# Altium PCB FullSheetOLD.PcbDoc (part 6 of 8)
Units mm, origin at the board's own origin, x right, y up, seen from the top; angles counter-clockwise.
Board outline 132.46 x 194.44 mm, 4 copper layers (Top Copper, L2_GND, L3_PWR_SIG, Bottom Copper), stack 1.586 mm thick; 495 components, 210 nets, 2171 pads, 1027 vias.
Unrouted connection lines stored in the file: 53.
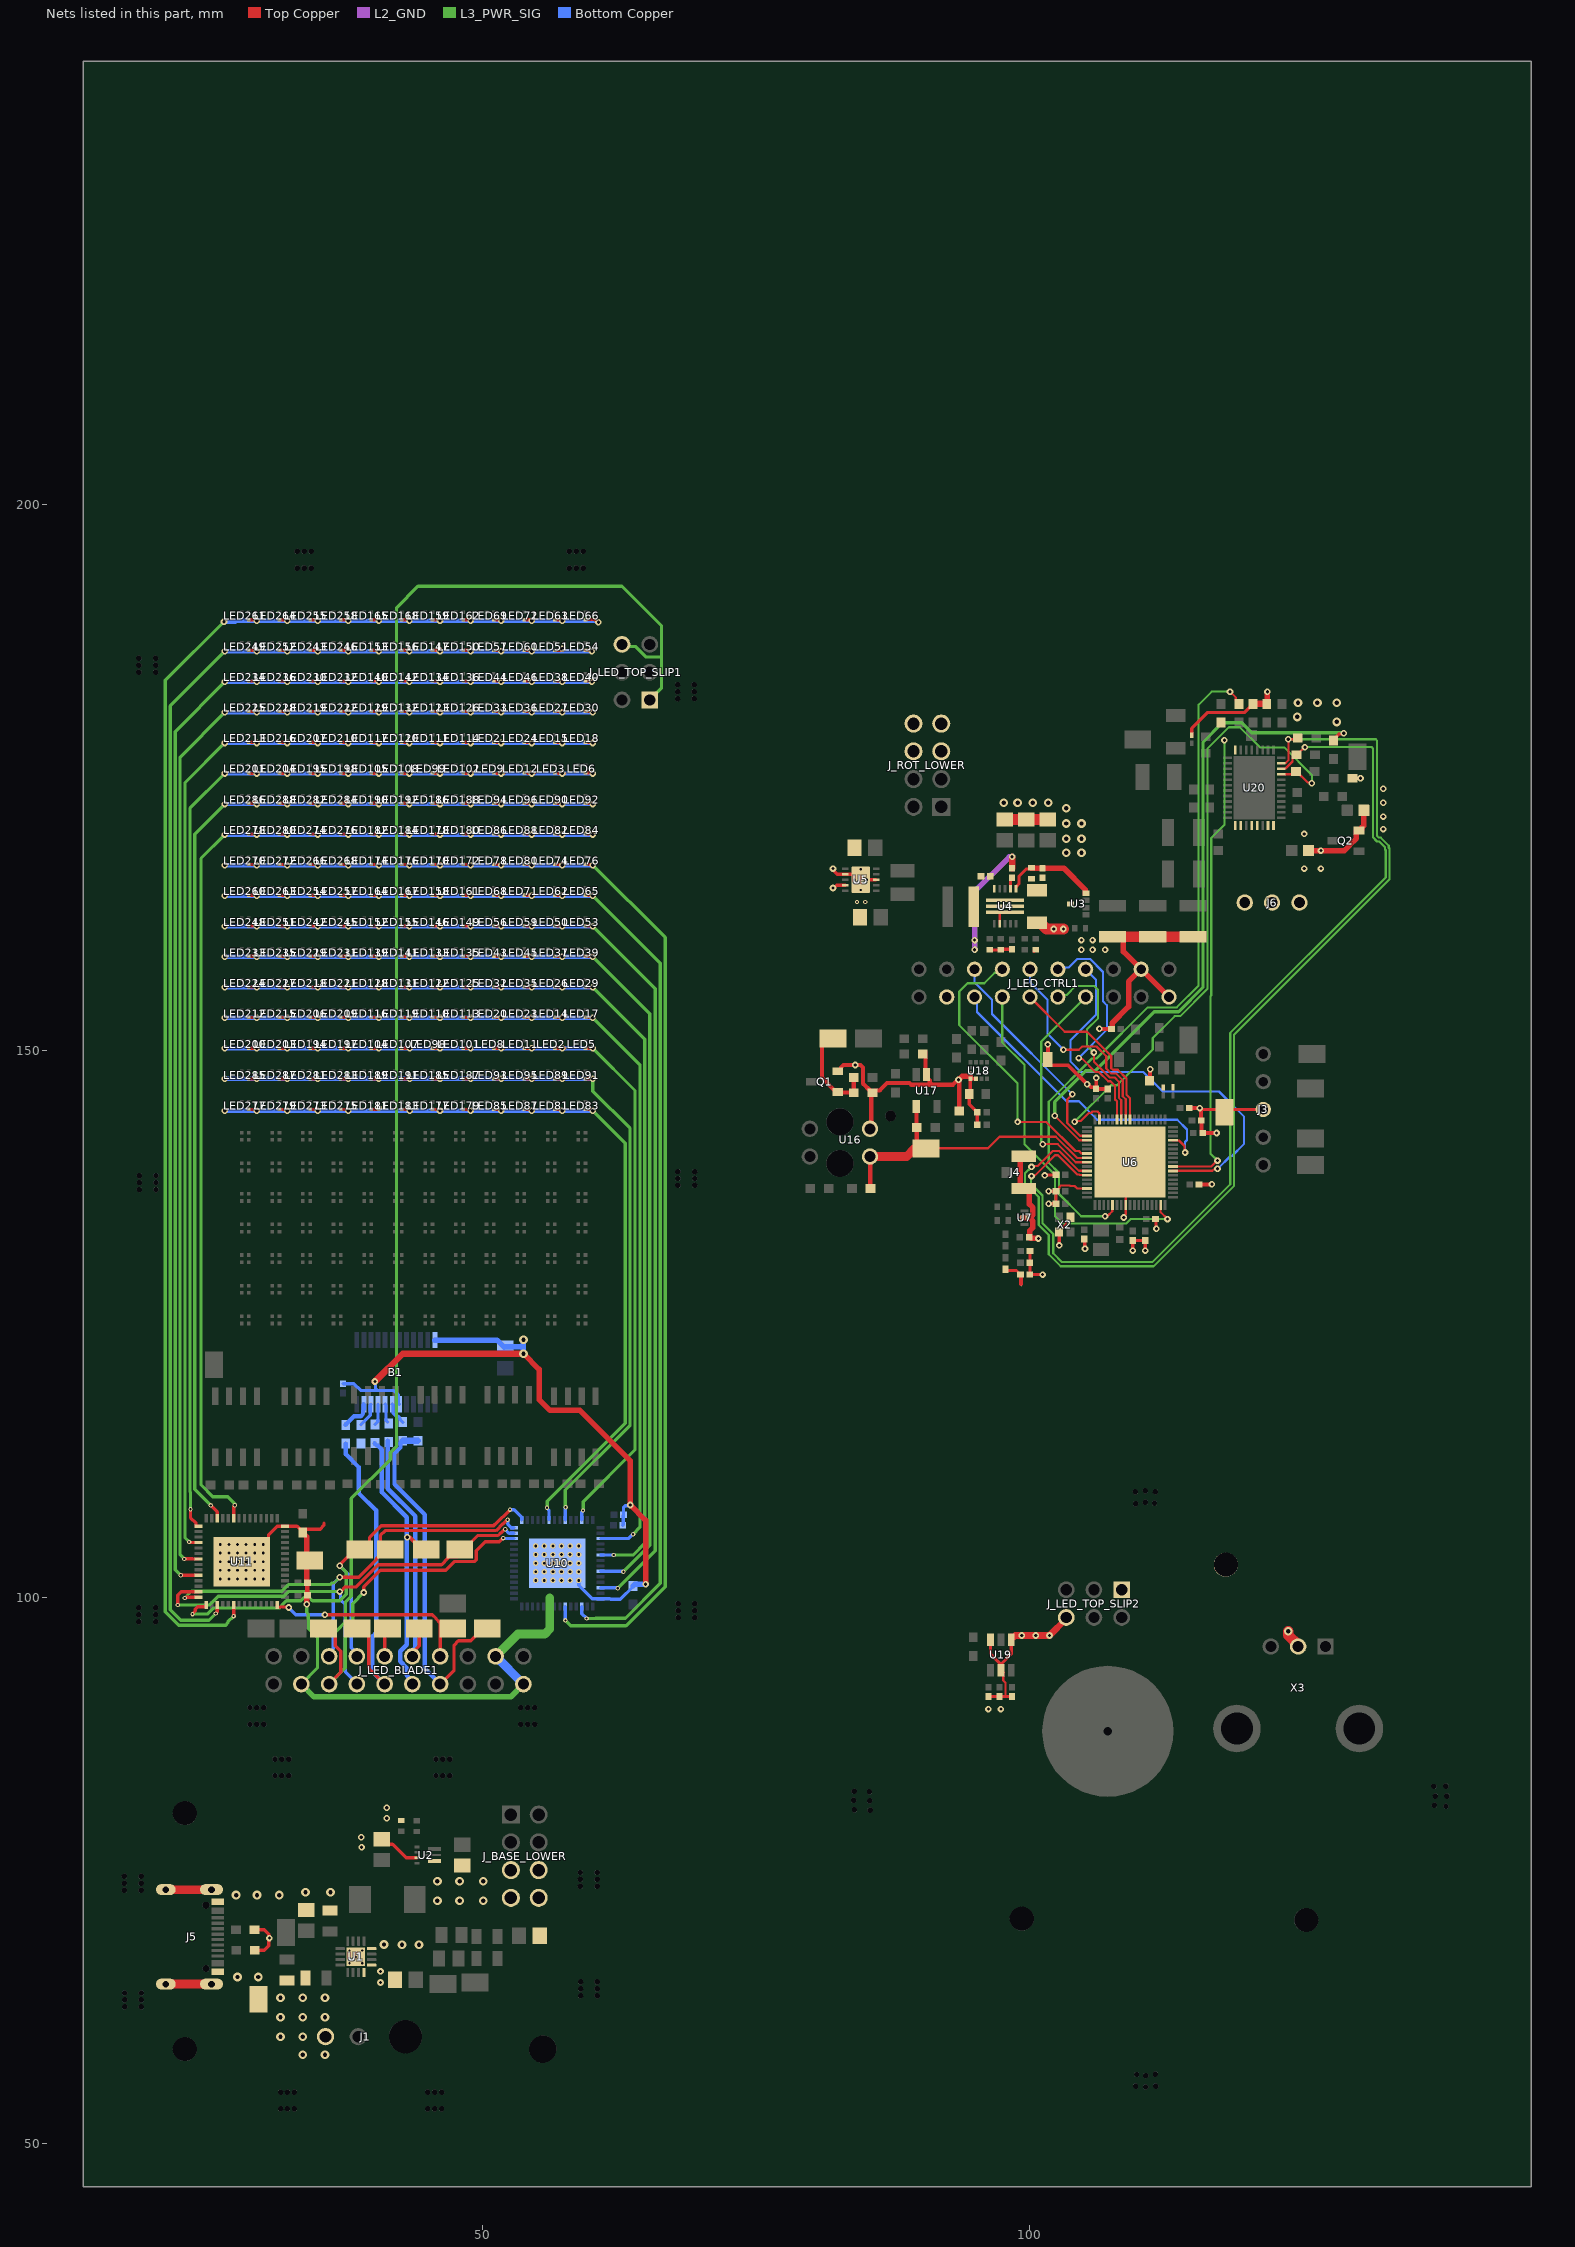
[diagram p7: the nets of this part, all layers, seen from the top]

## Via types
v1: diameter 0.6, hole 0.3, Top Copper to Bottom Copper, 857 vias
v2: diameter 0.8, hole 0.4, Top Copper to Bottom Copper, 91 vias
v3: diameter 0.4, hole 0.2, Top Copper to Bottom Copper, 79 vias

## Nets (pads, with @x,y where several pads share a name; then routed paths per layer and width w, separated by ;. In a path a pad name is that pad's centre, name@x,y a point inside that pad or via, vN(x,y) a via of type N, cw(c..) or ccw(c..) an arc to the next point about the centre after c; other vN are vias at no path point) (continued)
G7: LED81.2 LED83.2 LED85.2 LED87.2 LED177.2 LED179.2 LED181.2 LED183.2 LED273.2 LED275.2 LED277.2 LED279.2 U10.34 | length 82.1
  Top Copper w0.3: LED277.2@28.6,144.67 28.615,144.655 29.112,144.655 29.241,144.526 v1(29.322,144.526) ; LED279.2@31.536,144.655 v1@32.033,144.655 ; LED273.2@34.33,144.655 v1@34.827,144.655 ; LED275.2@37.124,144.655 v1@37.621,144.655 ; LED181.2@39.918,144.655 v1@40.415,144.655 ; LED183.2@42.712,144.655 v1@43.209,144.655 ; LED177.2@45.506,144.655 v1@46.003,144.655 ; LED179.2@48.3,144.655 v1@48.797,144.655 ; 51.221,144.655 v1@51.718,144.655 ; 54.015,144.655 v1@54.512,144.655 ; 56.809,144.655 v1@57.306,144.655 ; LED83.2@59.4,144.67 59.415,144.655 59.861,144.655 59.99,144.526 v1(60.071,144.526)
  L3_PWR_SIG w0.3: v3(55.88,108.204) 55.899,108.223 55.899,108.813 63.028,115.942 63.028,141.569 v1(60.071,144.526)
  Bottom Copper w0.3: v3(55.88,108.204) 55.88,108.177 56.057,108 U10.34@56.057,107.097
  Bottom Copper w0.4: v1(26.401,144.526) v1(29.322,144.526) v1(32.116,144.526) v1(34.91,144.526) v1(37.704,144.526) v1@40.498,144.526 ; v1(40.498,144.805) v1@40.498,144.526 ; v1(60.071,144.526) v1(57.262,144.526) v1(54.483,144.526) v1(51.674,144.526) v1(48.88,144.526) v1(46.086,144.526) v1(43.307,144.526) v1@40.498,144.526
G8: LED89.2 LED91.2 LED93.2 LED95.2 LED185.2 LED187.2 LED189.2 LED191.2 LED281.2 LED283.2 LED285.2 LED287.2 U10.37 | length 86.3
  Top Copper w0.3: LED285.2@28.6,147.47 28.611,147.459 29.311,147.459 v1(29.322,147.447) ; LED287.2@31.532,147.459 v1@32.232,147.459 ; LED281.2@34.326,147.459 v1@35.026,147.459 ; LED283.2@37.12,147.459 v1@37.82,147.459 ; LED189.2@39.914,147.459 v1@40.614,147.459 ; LED191.2@42.708,147.459 v1@43.408,147.459 ; LED185.2@45.502,147.459 v1@46.202,147.459 ; LED187.2@48.296,147.459 v1@48.996,147.459 ; 51.217,147.459 v1@51.917,147.459 ; 54.011,147.459 v1@54.711,147.459 ; 56.805,147.459 v1@57.505,147.459 ; LED91.2@59.4,147.47 59.413,147.457 60.056,147.457 v1(60.068,147.444)
  L3_PWR_SIG w0.3: v3(57.575,108.248) 57.556,108.267 57.556,109.834 63.478,115.755 63.478,142.911 60.071,146.318 60.071,147.442 v1(60.068,147.444)
  Bottom Copper w0.3: U10.37@57.557,107.097 57.557,108.23 v3(57.575,108.248)
  Bottom Copper w0.4: v1(26.401,147.447) v1(29.322,147.447) v1(32.116,147.447) v1(34.91,147.447) v1(37.704,147.447) v1(40.498,147.447) v1(43.307,147.447) v1(46.086,147.447) v1(48.88,147.447) v1(51.674,147.447) v1(54.483,147.447) v1(57.262,147.447) 57.263,147.446 60.067,147.446 v1(60.068,147.444)
G9: LED2.2 LED5.2 LED8.2 LED11.2 LED98.2 LED101.2 LED104.2 LED107.2 LED194.2 LED197.2 LED200.2 LED203.2 U10.40 | length 88.8
  Top Copper w0.3: LED200.2@28.6,150.27 28.614,150.256 29.308,150.256 v1(29.322,150.241) ; LED203.2@31.535,150.256 v1@32.229,150.256 ; LED194.2@34.329,150.256 v1@35.023,150.256 ; LED197.2@37.123,150.256 v1@37.817,150.256 ; LED104.2@39.917,150.256 v1@40.611,150.256 ; LED107.2@42.711,150.256 v1@43.405,150.256 ; LED98.2@45.505,150.256 v1@46.199,150.256 ; LED101.2@48.299,150.256 v1@48.993,150.256 ; 51.22,150.256 v1@51.914,150.256 ; 54.014,150.256 v1@54.708,150.256 ; 56.808,150.256 v1@57.502,150.256 ; LED5.2@59.4,150.27 59.415,150.255 60.057,150.255 v1(60.071,150.241)
  L3_PWR_SIG w0.3: v3(59.171,107.958) 59.182,107.969 59.182,108.763 63.928,113.509 63.928,146.384 v1(60.071,150.241)
  Bottom Copper w0.3: U10.40@59.057,107.097 59.057,107.817 59.171,107.931 v3(59.171,107.958)
  Bottom Copper w0.4: v1(26.401,150.241) v1(29.322,150.241) v1(32.116,150.241) v1(34.91,150.241) v1(37.704,150.241) v1(40.498,150.241) v1(43.307,150.241) v1(46.086,150.241) v1(48.88,150.241) v1(51.674,150.241) v1(54.483,150.241) v1(57.262,150.241) v1(60.071,150.241)
G10: LED14.2 LED17.2 LED20.2 LED23.2 LED110.2 LED113.2 LED116.2 LED119.2 LED206.2 LED209.2 LED212.2 LED215.2 U10.45 | length 94.4
  Top Copper w0.3: LED212.2@28.6,153.07 28.615,153.055 29.302,153.055 v1(29.322,153.035) ; LED215.2@31.536,153.055 v1@32.223,153.055 ; LED206.2@34.33,153.055 v1@35.017,153.055 ; LED209.2@37.124,153.055 v1@37.811,153.055 ; LED116.2@39.918,153.055 v1@40.605,153.055 ; LED119.2@42.712,153.055 v1@43.399,153.055 ; LED110.2@45.506,153.055 v1@46.193,153.055 ; LED113.2@48.3,153.055 v1@48.987,153.055 ; 51.221,153.055 v1@51.908,153.055 ; 54.015,153.055 v1@54.702,153.055 ; 56.809,153.055 v1@57.496,153.055 ; LED17.2@59.4,153.07 59.415,153.055 60.051,153.055 v1(60.071,153.035)
  L3_PWR_SIG w0.3: v1(60.071,153.035) 64.378,148.728 64.378,106.415 v3(63.754,105.791)
  Bottom Copper w0.3: U10.45@60.768,105.387 63.323,105.387 63.727,105.791 v3(63.754,105.791)
  Bottom Copper w0.4: v1(26.401,153.035) v1(29.322,153.035) v1(32.116,153.035) v1(34.91,153.035) v1(37.704,153.035) v1(40.498,153.035) v1(43.292,153.035) v1(46.086,153.035) v1(48.88,153.035) v1(51.674,153.035) v1(54.483,153.035) v1(57.262,153.035) v1(60.071,153.035)
G11: LED26.2 LED29.2 LED32.2 LED35.2 LED122.2 LED125.2 LED128.2 LED131.2 LED218.2 LED221.2 LED224.2 LED227.2 U10.48 | length 99.3
  Top Copper w0.3: LED224.2@28.6,155.87 28.615,155.855 29.296,155.855 v1(29.322,155.829) ; LED227.2@31.536,155.855 v1@32.217,155.855 ; LED218.2@34.33,155.855 v1@35.011,155.855 ; LED221.2@37.124,155.855 v1@37.805,155.855 ; LED128.2@39.918,155.855 v1@40.599,155.855 ; LED131.2@42.712,155.855 v1@43.393,155.855 ; LED122.2@45.506,155.855 v1@46.187,155.855 ; LED125.2@48.3,155.855 v1@48.981,155.855 ; 51.221,155.855 v1@51.902,155.855 ; 54.015,155.855 v1@54.696,155.855 ; 56.809,155.855 v1@57.49,155.855 ; LED29.2@59.4,155.87 59.415,155.855 60.045,155.855 v1(60.071,155.829)
  L3_PWR_SIG w0.3: v1(60.071,155.829) 64.828,151.072 64.828,104.957 63.758,103.887 v3(61.976,103.887)
  Bottom Copper w0.3: U10.48@60.768,103.887 v3(61.976,103.887)
  Bottom Copper w0.4: v1(26.401,155.829) v1(29.322,155.829) v1(32.116,155.829) v1(34.91,155.829) v1(37.704,155.829) v1(40.498,155.829) v1(43.292,155.829) v1(46.086,155.829) v1(48.88,155.829) v1(51.674,155.829) v1(54.483,155.829) v1(57.262,155.829) v1(60.071,155.829)
G12: LED37.2 LED39.2 LED43.2 LED45.2 LED133.2 LED135.2 LED139.2 LED141.2 LED229.2 LED231.2 LED233.2 LED235.2 U10.51 | length 103.4
  Top Copper w0.3: LED233.2@28.6,158.67 28.615,158.655 29.29,158.655 v1(29.322,158.623) ; LED235.2@31.536,158.655 v1@32.211,158.655 ; LED229.2@34.33,158.655 v1@35.005,158.655 ; LED231.2@37.124,158.655 v1@37.799,158.655 ; LED139.2@39.918,158.655 v1@40.593,158.655 ; LED141.2@42.712,158.655 v1@43.387,158.655 ; LED133.2@45.506,158.655 v1@46.181,158.655 ; LED135.2@48.3,158.655 v1@48.975,158.655 ; 51.221,158.655 v1@51.896,158.655 ; 54.015,158.655 v1@54.69,158.655 ; 56.809,158.655 v1@57.484,158.655 ; LED39.2@59.4,158.67 59.415,158.655 60.039,158.655 v1(60.071,158.623)
  L3_PWR_SIG w0.3: v1(60.071,158.623) 65.278,153.416 65.278,104.77 63.69,103.182 v3(62.865,102.357)
  Bottom Copper w0.3: U10.51@60.768,102.387 62.809,102.386 62.838,102.357 v3(62.865,102.357)
  Bottom Copper w0.4: v1(26.401,158.623) v1(29.322,158.623) v1(32.116,158.623) v1(34.91,158.623) v1(37.704,158.623) v1(40.498,158.623) v1(43.292,158.623) v1(46.086,158.623) v1(48.88,158.623) v1(51.674,158.623) v1(54.483,158.623) v1(57.262,158.623) v1(60.071,158.623)
G13: LED50.2 LED53.2 LED56.2 LED59.2 LED146.2 LED149.2 LED152.2 LED155.2 LED242.2 LED245.2 LED248.2 LED251.2 U10.54 | length 107.8
  Top Copper w0.3: LED248.2@28.6,161.47 28.615,161.455 29.284,161.455 v1(29.322,161.417) ; LED251.2@31.536,161.455 v1@32.205,161.455 ; LED242.2@34.33,161.455 v1@34.999,161.455 ; LED245.2@37.124,161.455 v1@37.793,161.455 ; LED152.2@39.918,161.455 v1@40.587,161.455 ; LED155.2@42.712,161.455 v1@43.381,161.455 ; LED146.2@45.506,161.455 v1@46.175,161.455 ; LED149.2@48.3,161.455 v1@48.969,161.455 ; 51.221,161.455 v1@51.89,161.455 ; 54.015,161.455 v1@54.684,161.455 ; 56.809,161.455 v1@57.478,161.455 ; LED53.2@59.4,161.47 59.415,161.455 60.033,161.455 v1(60.071,161.417)
  L3_PWR_SIG w0.3: v1(60.071,161.417) 65.786,155.702 65.786,104.267 v3(62.357,100.838)
  Bottom Copper w0.3: U10.54@60.768,100.886 62.282,100.886 62.33,100.838 v3(62.357,100.838)
  Bottom Copper w0.4: v1(26.401,161.417) v1(29.322,161.417) v1(32.116,161.417) v1(34.91,161.417) v1(37.704,161.417) v1(40.498,161.417) v1(43.292,161.417) v1(46.086,161.417) v1(48.88,161.417) v1(51.674,161.417) v1(54.483,161.417) v1(57.262,161.417) v1(60.071,161.417)
G14: LED62.2 LED65.2 LED68.2 LED71.2 LED158.2 LED161.2 LED164.2 LED167.2 LED254.2 LED257.2 LED260.2 LED263.2 U10.3 | length 116.6
  Top Copper w0.3: LED260.2@28.6,164.27 28.615,164.255 29.278,164.255 v1(29.322,164.211) ; LED263.2@31.536,164.255 v1@32.199,164.255 ; LED254.2@34.33,164.255 v1@34.993,164.255 ; LED257.2@37.124,164.255 v1@37.787,164.255 ; LED164.2@39.918,164.255 v1@40.581,164.255 ; LED167.2@42.712,164.255 v1@43.375,164.255 ; LED158.2@45.506,164.255 v1@46.169,164.255 ; LED161.2@48.3,164.255 v1@48.963,164.255 ; 51.221,164.255 v1@51.884,164.255 ; 54.015,164.255 v1@54.678,164.255 ; 56.809,164.255 v1@57.472,164.255 ; LED65.2@59.4,164.27 59.415,164.255 60.027,164.255 v1(60.071,164.211)
  L3_PWR_SIG w0.3: v3(59.498,98.077) 60.273,98.077 60.304,98.109 63.057,98.109 66.236,101.288 66.236,158.046 v1(60.071,164.211)
  Bottom Copper w0.3: U10.3@59.057,99.176 59.057,98.522 59.498,98.081 v3(59.498,98.077)
  Bottom Copper w0.4: v1(26.401,164.211) v1(29.322,164.211) v1(32.116,164.211) v1(34.91,164.211) v1(37.704,164.211) v1(40.498,164.211) v1(43.292,164.211) v1(46.086,164.211) v1(48.88,164.211) v1(51.674,164.211) v1(54.483,164.211) v1(57.262,164.211) v1(60.071,164.211)
G15: LED74.2 LED76.2 LED78.2 LED80.2 LED170.2 LED172.2 LED174.2 LED176.2 LED266.2 LED268.2 LED270.2 LED272.2 U10.6 | length 122.5
  Top Copper w0.3: LED270.2@28.6,167.07 28.615,167.055 29.272,167.055 v1(29.322,167.005) ; LED272.2@31.536,167.055 v1@32.193,167.055 ; LED266.2@34.33,167.055 v1@34.987,167.055 ; LED268.2@37.124,167.055 v1@37.781,167.055 ; LED174.2@39.918,167.055 v1@40.575,167.055 ; LED176.2@42.712,167.055 v1@43.369,167.055 ; LED170.2@45.506,167.055 v1@46.163,167.055 ; LED172.2@48.3,167.055 v1@48.957,167.055 ; 51.221,167.055 v1@51.878,167.055 ; 54.015,167.055 v1@54.672,167.055 ; 56.809,167.055 v1@57.466,167.055 ; LED76.2@59.4,167.07 59.415,167.055 60.021,167.055 v1(60.071,167.005)
  L3_PWR_SIG w0.3: v3(57.557,97.9) 58.057,97.4 63.11,97.4 66.686,100.976 66.686,160.39 v1(60.071,167.005)
  Bottom Copper w0.3: v3(57.557,97.9) U10.6@57.557,99.176
  Bottom Copper w0.4: v1(26.401,167.005) v1(29.322,167.005) v1(32.116,167.005) v1(34.91,167.005) v1(37.704,167.005) v1(40.498,167.005) v1(43.292,167.005) v1(46.086,167.005) v1(48.88,167.005) v1(51.674,167.005) v1(54.483,167.005) v1(57.262,167.005) v1(60.071,167.005)
G16: LED82.2 LED84.2 LED86.2 LED88.2 LED178.2 LED180.2 LED182.2 LED184.2 LED274.2 LED276.2 LED278.2 LED280.2 U11.9 | length 107.3
  Top Copper w0.3: U11.9@27.203,107.237 27.203,108.308 27.305,108.411 v3(27.305,108.438) ; LED278.2@28.6,169.87 28.615,169.855 29.266,169.855 v1(29.322,169.799) ; LED280.2@31.536,169.855 v1@32.187,169.855 ; LED274.2@34.33,169.855 v1@34.981,169.855 ; LED276.2@37.124,169.855 v1@37.775,169.855 ; LED182.2@39.918,169.855 v1@40.569,169.855 ; LED184.2@42.712,169.855 v1@43.363,169.855 ; LED178.2@45.506,169.855 v1@46.157,169.855 ; LED180.2@48.3,169.855 v1@48.951,169.855 ; 51.221,169.855 v1@51.872,169.855 ; 54.015,169.855 v1@54.666,169.855 ; 56.809,169.855 v1@57.46,169.855 ; LED84.2@59.4,169.87 59.415,169.855 60.015,169.855 v1(60.071,169.799)
  L3_PWR_SIG w0.3: v1(26.401,169.799) 24.219,167.617 24.219,110.299 25.298,109.22 26.666,109.22 27.305,108.581 v3(27.305,108.438)
  Bottom Copper w0.3: v1(60.071,169.799) v1@60.128,169.856
  Bottom Copper w0.4: v1(26.401,169.799) v1(29.322,169.799) v1(32.116,169.799) v1(34.91,169.799) v1(37.704,169.799) v1(40.498,169.799) v1(43.292,169.799) v1(46.086,169.799) v1(48.88,169.799) v1(51.674,169.799) v1(54.483,169.799) v1(57.262,169.799) v1(60.071,169.799)
G17: LED90.2 LED92.2 LED94.2 LED96.2 LED186.2 LED188.2 LED190.2 LED192.2 LED282.2 LED284.2 LED286.2 LED288.2 U11.12 | length 108.1
  Top Copper w0.3: v3(25.11,108.422) 25.703,107.829 U11.12@25.703,107.237 ; LED286.2@28.6,172.67 28.615,172.655 29.179,172.655 29.241,172.593 v1(29.322,172.593) ; LED288.2@31.536,172.655 v1@32.1,172.655 ; LED282.2@34.33,172.655 v1@34.894,172.655 ; LED284.2@37.124,172.655 v1@37.688,172.655 ; LED190.2@39.918,172.655 v1@40.482,172.655 ; LED192.2@42.712,172.655 v1@43.276,172.655 ; LED186.2@45.506,172.655 v1@46.07,172.655 ; LED188.2@48.3,172.655 v1@48.864,172.655 ; 51.221,172.655 v1@51.785,172.655 ; 54.015,172.655 v1@54.579,172.655 ; 56.809,172.655 v1@57.373,172.655 ; LED92.2@59.4,172.67 59.415,172.655 59.928,172.655 59.99,172.593 v1(60.071,172.593)
  L3_PWR_SIG w0.3: v3(25.11,108.422) 25.11,108.439 23.655,109.894 23.655,169.847 v1(26.401,172.593)
  Bottom Copper w0.4: v1(26.401,172.593) v1(29.322,172.593) v1(32.116,172.593) v1(34.91,172.593) v1(37.704,172.593) v1(40.498,172.593) v1(43.292,172.593) v1(46.086,172.593) v1(48.88,172.593) v1(51.674,172.593) v1(54.468,172.593) v1(57.262,172.593) v1(60.071,172.593)
G18: LED3.2 LED6.2 LED9.2 LED12.2 LED99.2 LED102.2 LED105.2 LED108.2 LED195.2 LED198.2 LED201.2 LED204.2 U11.15 | length 112.2
  Top Copper w0.3: v3(23.255,108.077) 23.255,107.309 23.765,106.799 23.765,106.527 U11.15@23.992,106.527 ; LED201.2@28.6,175.47 28.683,175.387 v1(29.322,175.387) ; 31.604,175.387 v1@32.243,175.387 ; 34.398,175.387 v1@35.037,175.387 ; 37.192,175.387 v1@37.831,175.387 ; 39.986,175.387 v1@40.625,175.387 ; 42.78,175.387 v1@43.419,175.387 ; 45.574,175.387 v1@46.213,175.387 ; 48.368,175.387 v1@49.007,175.387 ; 51.289,175.387 v1(51.674,175.387) v1@51.928,175.387 ; 54.083,175.387 v1(54.468,175.387) v1@54.722,175.387 ; 56.877,175.387 v1(57.262,175.387) v1@57.516,175.387 ; LED6.2@59.4,175.47 59.415,175.455 59.922,175.455 59.99,175.387 v1(60.071,175.387)
  L3_PWR_SIG w0.3: v3(23.255,108.077) 23.255,109.658 23.205,109.708 23.205,172.191 v1(26.401,175.387)
  Bottom Copper w0.4: v1(26.401,175.387) v1(29.322,175.387) v1(32.116,175.387) v1(34.91,175.387) v1(37.704,175.387) v1(40.498,175.387) v1(43.292,175.387) v1(46.086,175.387) v1(48.88,175.387) v1(51.674,175.387) v1(54.468,175.387) v1(57.262,175.387) v1(60.071,175.387)
G19: LED15.2 LED18.2 LED21.2 LED24.2 LED111.2 LED114.2 LED117.2 LED120.2 LED207.2 LED210.2 LED213.2 LED216.2 U11.18 | length 116.3
  Top Copper w0.3: v3(23.132,105.077) 23.159,105.077 23.209,105.027 U11.18@23.992,105.027 ; LED213.2@28.6,178.27 28.615,178.255 29.167,178.255 29.241,178.181 v1(29.322,178.181) ; LED216.2@31.536,178.255 v1@32.088,178.255 ; LED207.2@34.33,178.255 v1@34.882,178.255 ; LED210.2@37.124,178.255 v1@37.676,178.255 ; LED117.2@39.918,178.255 v1@40.47,178.255 ; LED120.2@42.712,178.255 v1@43.264,178.255 ; LED111.2@45.506,178.255 v1@46.058,178.255 ; LED114.2@48.3,178.255 v1@48.852,178.255 ; 51.221,178.255 v1@51.773,178.255 ; 54.015,178.255 v1@54.567,178.255 ; 56.809,178.255 v1@57.361,178.255 ; LED18.2@59.4,178.27 59.415,178.255 59.916,178.255 59.99,178.181 v1(60.071,178.181)
  L3_PWR_SIG w0.3: v3(23.132,105.077) 22.755,105.454 22.755,174.535 v1(26.401,178.181)
  Bottom Copper w0.4: v1(26.401,178.181) v1(29.322,178.181) v1(32.116,178.181) v1(34.91,178.181) v1(37.704,178.181) v1(40.498,178.181) v1(43.292,178.181) v1(46.086,178.181) v1(48.88,178.181) v1(51.674,178.181) v1(54.468,178.181) v1(57.262,178.181) v1(60.071,178.181)
G20: LED27.2 LED30.2 LED33.2 LED36.2 LED123.2 LED126.2 LED129.2 LED132.2 LED219.2 LED222.2 LED225.2 LED228.2 U11.21 | length 121.2
  Top Copper w0.3: v3(22.678,103.516) 22.695,103.533 23.448,103.533 23.455,103.526 U11.21@23.983,103.526 ; LED225.2@28.6,181.07 28.615,181.055 29.161,181.055 29.241,180.975 v1(29.322,180.975) ; LED228.2@31.536,181.055 v1@32.082,181.055 ; LED219.2@34.33,181.055 v1@34.876,181.055 ; LED222.2@37.124,181.055 v1@37.67,181.055 ; LED129.2@39.918,181.055 v1@40.464,181.055 ; LED132.2@42.712,181.055 v1@43.258,181.055 ; LED123.2@45.506,181.055 v1@46.052,181.055 ; LED126.2@48.3,181.055 v1@48.846,181.055 ; 51.221,181.055 v1@51.767,181.055 ; 54.015,181.055 v1@54.561,181.055 ; 56.809,181.055 v1@57.355,181.055 ; LED30.2@59.4,181.07 59.415,181.055 59.91,181.055 59.99,180.975 v1(60.071,180.975)
  L3_PWR_SIG w0.3: v3(22.678,103.516) 22.678,103.543 22.305,103.916 22.305,176.879 v1(26.401,180.975)
  Bottom Copper w0.4: v1(26.401,180.975) v1(29.322,180.975) v1(32.116,180.975) v1(34.91,180.975) v1(37.704,180.975) v1(40.498,180.975) v1(43.292,180.975) v1(46.086,180.975) v1(48.88,180.975) v1(51.674,180.975) v1(54.468,180.975) v1(57.262,180.975) v1(60.071,180.975)
G21: LED38.2 LED40.2 LED44.2 LED46.2 LED134.2 LED136.2 LED140.2 LED142.2 LED230.2 LED232.2 LED234.2 LED236.2 U11.24 | length 125.8
  Top Copper w0.3: v3(22.361,102.033) 23.082,102.033 23.09,102.026 U11.24@23.992,102.026 ; LED234.2@28.6,183.87 28.615,183.855 29.155,183.855 29.241,183.769 v1(29.322,183.769) ; LED236.2@31.536,183.855 v1@32.076,183.855 ; LED230.2@34.33,183.855 v1@34.87,183.855 ; LED232.2@37.124,183.855 v1@37.664,183.855 ; LED140.2@39.918,183.855 v1@40.458,183.855 ; LED142.2@42.712,183.855 v1@43.252,183.855 ; LED134.2@45.506,183.855 v1@46.046,183.855 ; LED136.2@48.3,183.855 v1@48.84,183.855 ; 51.221,183.855 v1@51.761,183.855 ; 54.015,183.855 v1@54.555,183.855 ; 56.809,183.855 v1@57.349,183.855 ; LED40.2@59.4,183.87 59.415,183.855 59.821,183.855 59.907,183.769 v1(59.988,183.769)
  L3_PWR_SIG w0.3: v3(22.361,102.033) 21.855,102.539 21.855,179.223 v1(26.401,183.769)
  Bottom Copper w0.4: v1(26.401,183.769) v1(29.322,183.769) v1(32.116,183.769) v1(34.91,183.769) v1(37.704,183.769) v1(40.498,183.769) v1(43.292,183.769) v1(46.086,183.769) v1(48.88,183.769) v1(51.674,183.769) v1(54.468,183.769) v1(59.988,183.769)
  other v1: 57.262,183.769
G22: LED51.2 LED54.2 LED57.2 LED60.2 LED147.2 LED150.2 LED153.2 LED156.2 LED243.2 LED246.2 LED249.2 LED252.2 U11.31 | length 136
  Top Copper w0.3: v3(25.566,98.533) 25.566,98.56 25.703,98.697 U11.31@25.703,99.316 ; LED249.2@28.6,186.67 28.615,186.655 29.149,186.655 29.241,186.563 v1(29.322,186.563) ; LED252.2@31.536,186.655 v1@32.07,186.655 ; LED243.2@34.33,186.655 v1@34.864,186.655 ; LED246.2@37.124,186.655 v1@37.658,186.655 ; LED153.2@39.918,186.655 v1@40.452,186.655 ; LED156.2@42.712,186.655 v1@43.246,186.655 ; LED147.2@45.506,186.655 v1@46.04,186.655 ; LED150.2@48.3,186.655 v1@48.834,186.655 ; 51.221,186.655 v1@51.755,186.655 ; 54.015,186.655 v1@54.549,186.655 ; 56.809,186.655 v1@57.343,186.655 ; LED54.2@59.4,186.67 59.415,186.655 59.815,186.655 59.907,186.563 v1(59.988,186.563)
  L3_PWR_SIG w0.3: v3(25.566,98.533) 24.95,97.917 22.352,97.917 21.405,98.864 21.405,181.567 v1(26.401,186.563)
  Bottom Copper w0.4: v1(26.401,186.563) v1(29.322,186.563) v1(32.116,186.563) v1(34.91,186.563) v1(37.704,186.563) v1(40.498,186.563) v1(43.292,186.563) v1(46.086,186.563) v1(48.88,186.563) v1(51.674,186.563) v1(54.468,186.563) v1@57.262,186.563 ; v1(57.262,186.805) v1@57.262,186.563 ; v1(59.988,186.563) v1@57.262,186.563
G23: LED63.2 LED66.2 LED69.2 LED72.2 LED159.2 LED162.2 LED165.2 LED168.2 LED255.2 LED258.2 LED261.2 LED264.2 U11.34 | length 142.7
  Top Copper w0.3: v3(27.203,98.297) U11.34@27.203,99.316 ; LED261.2@28.6,189.47 28.615,189.455 29.143,189.455 29.241,189.357 v1(29.322,189.357) ; LED264.2@31.536,189.455 v1@32.064,189.455 ; LED255.2@34.33,189.455 v1@34.858,189.455 ; LED258.2@37.124,189.455 v1@37.652,189.455 ; LED165.2@39.918,189.455 v1@40.446,189.455 ; LED168.2@42.712,189.455 v1@43.24,189.455 ; LED159.2@45.506,189.455 v1@46.034,189.455 ; LED162.2@48.3,189.455 v1@48.828,189.455 ; 51.221,189.455 v1@51.749,189.455 ; 54.015,189.455 v1@54.543,189.455 ; 56.809,189.455 v1@57.337,189.455 ; LED66.2@59.4,189.47 60.258,189.47 60.498,189.23 v1(60.579,189.23)
  L3_PWR_SIG w0.3: v1(26.322,189.278) 20.955,183.911 20.955,98.678 22.166,97.467 26.474,97.467 26.688,97.681 26.688,97.782 v3(27.203,98.297)
  Bottom Copper w0.4: v1(26.322,189.278) 27.343,189.278 27.422,189.357 v1(29.322,189.357) v1(32.116,189.357) v1(34.91,189.357) v1(37.704,189.357) v1(40.498,189.357) v1(43.292,189.357) v1(46.086,189.357) v1(48.88,189.357) v1(51.674,189.357) v1(54.468,189.357) 60.398,189.357 60.525,189.23 v1(60.579,189.23)
  other v1: 57.262,189.357
GND_BASE: C1.1 C2.1 C3.1 C4.1 C5.1 J1.2 J5.A1_B12 J5.B1_A12 J5.SH1 J5.SH2 J5.SH3 J5.SH4 J_BASE_LOWER.5 J_BASE_LOWER.6 J_BASE_LOWER.7 J_BASE_LOWER.8 R3.1 R4.1 R5.1 R8.1 R50.1 R51.2 TP_GB.1 U1.4 U1.5 U1.8 U1.17 U2.1 U2.6 | length 16.4
  Top Copper w0.3: R50.1@29.12,69.596 30.02,69.596 30.423,69.194 30.423,68.891 v1(30.48,68.834) 30.423,68.777 30.423,68.143 29.998,67.718 R51.2@29.142,67.718 ; C4.1@40.767,77.887 41.224,77.43 41.747,77.43 42.998,76.179 U2.6@43.983,76.179
  Top Copper w0.8: J5.SH4@21.001,64.629 J5.SH2@25.181,64.629 ; J5.SH3@21.001,73.269 J5.SH1@25.181,73.269 J5.SH1@25.219,73.231
  other v1: 40.64,64.77 40.64,65.786 38.913,77.14 38.887,78.054 41.224,79.807 41.224,80.772
  other v2: 33.528,58.166 35.56,58.166 31.496,59.817 33.528,59.817 31.496,61.595 33.528,61.595 35.56,61.595 31.496,63.373 33.528,63.373 35.56,63.373 27.559,65.278 29.464,65.278 42.61,68.223 44.166,68.223 40.963,68.249 45.847,72.263 47.879,72.263 50.038,72.263 27.432,72.771 29.337,72.771 31.369,72.771 33.782,73.025 36.068,73.025 45.847,74.041 47.879,74.041 50.038,74.041
GND_LED: B1.12 B1.18 C39.1 C40.1 C41.1 C42.1 C43.1 C44.1 J_LED_BLADE1.3 J_LED_BLADE1.18 J_LED_BLADE1.19 J_LED_TOP_SLIP1.01 J_LED_TOP_SLIP1.06 R22.1 R23.1 TP2.1 U10.56 U10.57 U11.56 U11.57 | length 263.7
  Top Copper w0.3: U11.57@27.953,103.276 28.303,103.276 29.112,104.086 29.899,104.873 30.403,105.376 30.403,105.726 31.204,106.527 U11.56@31.913,106.527 33.008,106.527 33.528,106.007 R23.1@33.528,105.957 ; R23.1@33.528,106.004 33.778,106.254 35.134,106.254 35.468,106.588 35.468,106.807
  Top Copper w0.4: C41.1@33.957,100.203 C42.1@33.957,101.346
  Top Copper w0.5: R23.1@33.528,105.957 33.528,105.907 33.899,105.536 33.899,103.759 33.899,101.382 33.935,101.346 C42.1@33.957,101.346 ; v1(33.886,99.375) 33.905,99.394 33.905,100.167 33.941,100.203 C41.1@33.957,100.203 ; v2(53.721,122.301) 55.162,120.86 55.162,118.111 56.164,117.109 58.882,117.109 63.5,112.491 v1(63.5,108.458) 64.897,107.061 v1(64.897,101.219)
  Top Copper w0.6: v1(40.132,119.761) 42.672,122.301 v2(53.721,122.301)
  L3_PWR_SIG w0.3: J_LED_BLADE1.3@33.401,92.075 34.879,93.553 34.879,96.347 34.325,96.901 ; v1(33.886,99.375) 33.886,98.625 34.036,98.475 34.036,97.19 34.325,96.901 ; J_LED_TOP_SLIP1.06@62.738,187.198 62.919,187.017 63.953,187.017 64.914,186.056 66.343,186.056 ; J_LED_TOP_SLIP1.01@65.278,182.118 66.343,183.183 66.343,186.056 ; 34.325,96.901 36.576,96.901 37.431,97.756 37.431,99.569 37.968,100.106 37.968,109.062 41.522,112.616 41.522,113.252 42.109,113.84 42.109,190.572 44.069,192.532 62.739,192.532 66.343,188.928 66.343,186.056
  L3_PWR_SIG w0.5: J_LED_BLADE1.3@33.401,92.075 34.563,90.913 52.559,90.913 J_LED_BLADE1.19@53.721,92.075
  L3_PWR_SIG w0.8: J_LED_BLADE1.18@51.181,94.615 53.213,96.647 55.665,96.647 56.134,97.116 56.134,99.949
  Bottom Copper w0.3: C44.1@37.211,119.555 38.206,119.555 38.817,118.943 40.328,118.943 ; v1(40.132,119.761) 40.189,119.704 40.189,119.082 40.328,118.943 ; B1.18@42.368,117.678 42.293,117.753 42.293,118.49 41.84,118.943 40.328,118.943 ; U10.57@58.776,101.562 58.776,101.117 60.007,99.886 U10.56@60.768,99.886 61.625,99.886 61.68,99.83 62.581,99.83 63.754,101.003 R22.1@63.754,101.053 ; C40.1@62.816,106.601 62.84,106.626 62.84,107.544 C39.1@62.865,107.569 62.865,108.225 63.041,108.401 63.443,108.401 v1(63.5,108.458)
  Bottom Copper w0.5: B1.12@45.618,123.554 51.286,123.554 51.97,122.87 52.036,122.936 53.721,122.936 ; v2(53.721,122.301) 53.721,122.936 ; v2(53.721,123.571) 53.721,122.936 ; R22.1@63.754,101.053 63.901,101.2 64.878,101.2 v1(64.897,101.219)
  Bottom Copper w0.8: J_LED_BLADE1.18@51.181,94.615 J_LED_BLADE1.19@53.721,92.075
GND_ROT: C7.1 C9.1 C10.1 C11.1 C12.1 C13.1 C14.1 C15.1 C16.1 C17.1 C18.1 C19.1 C20.1 C21.1 C22.1 C23.1 C24.1 C25.1 C26.1 C27.1 C28.1 C29.1 C30.1 C31.1 C32.1 C33.1 C34.1 C35.2 C36.1 C37_DNP.2 C38_DNP.2 C45.2 C46.2 C47.1 C48.1 J3.3 J4.2 J4.3 J8.1 J9.1 J10.2 J_LED_CTRL1.3 J_LED_CTRL1.18 J_LED_CTRL1.19 J_ROT_LOWER.5 J_ROT_LOWER.6 J_ROT_LOWER.7 J_ROT_LOWER.8 Q1.2 Q2.2 R11.1 R12.1 R13.1 R17.1 R41.2 R45.1 R56.1 R57.1 R64.1 SW1.1 TP6.1 U4.2 U4.6 U5.3 U5.7 U5.9 U5.11 U6.32 U6.42 U6.69 U7.2 U7.4 U16.E U17.2 U18.6 U18.7 U18.8 X2.2 X2.4 | length 152.1
  Top Copper w0.2: C26.1@102.454,137.16 102.463,137.16 102.741,137.438 102.741,137.55 102.887,137.696 103.71,137.696 103.756,137.65 104.137,137.65 104.36,137.427 U6.32@105.296,137.427 ; X2.4@102.726,133.437 102.726,133.475 103.145,133.894 103.145,133.96 103.357,134.172 103.357,134.33 103.776,134.749 X2.2@103.776,134.787 ; v1(108.646,134.767) 108.646,134.875 108.82,135.049 U6.42@108.82,135.903 108.82,139.427 U6.69@109.22,139.827
  Top Copper w0.25: U4.2@97.29,161.637 97.29,162.637 97.34,162.687 U4.6@97.79,162.687
  Top Copper w0.3: v1(82.042,164.912) 82.123,164.912 82.385,165.174 U5.9@83.182,165.174 ; v1(82.042,166.69) 82.099,166.632 82.099,166.506 82.432,166.174 U5.7@83.182,166.174 84.082,166.174 U5.11@84.582,165.674 ; U5.11@85.157,165.674 U5.3@85.982,165.674 ; U18.6@94.617,147.959 94.622,147.954 94.622,147.704 ; U18.8@95.127,147.449 U18.7@94.627,147.449 94.602,147.424 94.602,146.14 C46.2@94.512,146.05 94.512,145.116 95.229,144.399 C47.1@95.25,144.399 C48.1@95.25,143.256 ; R11.1@96.393,159.238 97.373,159.238 97.409,159.202 97.509,159.302 97.727,159.302 97.735,159.309 C16.1@98.425,159.309 ; C35.2@100.067,131.694 100.057,131.684 100.057,129.55 C38_DNP.2@100.047,129.54 v1(101.219,129.54) ; R13.1@100.434,159.138 100.434,159.174 100.498,159.238 R13.1@100.584,159.238 ; v1(101.406,138.617) 101.439,138.65 102.408,138.65 C21.1@102.441,138.684 ; v1(101.769,136.017) C27.1@102.394,136.017 ; v1(101.769,137.16) C26.1@102.418,137.16 ; C27.1@102.441,136.017 C26.1@102.441,137.16 ; X2.4@102.726,133.437 102.734,133.429 102.734,132.216 v1(102.743,132.207) ; C34.1@105.029,132.794 105.065,132.759 105.065,131.933 v1(105.1,131.897) ; v1(109.474,131.741) C28.1@109.474,132.667 C22.1@110.617,132.667 v1(110.617,131.741) ; C29.1@111.554,134.62 111.593,134.58 111.593,133.771 v1(111.633,133.731) ; J9.1@114.871,178.879 114.871,179.514 116.332,180.975 119.723,180.975 120.459,181.711 R64.1@120.459,181.761 ; v1@115.723,144.653 J3.3@121.412,144.653
  Top Copper w0.35: v1(101.704,150.599) SW1.1@101.704,149.225 101.704,148.971 101.973,148.702 103.555,148.702 v1(105.288,146.969) 105.355,146.969 105.647,146.678 105.997,146.678 106.108,146.566 C25.1@106.108,146.545 ; v1(106.134,147.536) 106.134,146.678 106.164,146.647 106.21,146.647 106.21,146.545 106.219,146.535 107.077,146.535 107.086,146.526 C24.1@107.188,146.526 ; v1(106.418,152.027) 106.422,152.023 107.517,152.023 C19.1@107.521,152.019 ; R17.1@110.998,147.281 111.034,147.317 111.034,148.3 v1(111.07,148.336) ; C33.1@114.649,144.78 v1(115.6,144.78) ; C32.1@115.538,137.795 v1(116.713,137.795) ; v1@115.648,144.665 115.723,144.589 C23.1@115.723,143.637 ; C20.1@115.745,142.494 C23.1@115.745,143.637 ; C20.1@115.872,142.494 v1(117.136,142.494)
  Top Copper w0.381: Q1.2@82.48,148.143 82.63,148.143 82.789,148.303 82.789,148.494 83.013,148.717 v1(84.074,148.717) 84.574,148.717 84.797,148.494 84.797,147.008 85.447,146.358 85.447,146.327 R45.1@85.597,146.177 ; U16.E@85.427,142.88 85.537,142.99 85.537,146.067 R45.1@85.647,146.177 ; R45.1@85.697,146.177 R45.1@85.647,146.177 ; R41.2@90.512,149.86 90.512,147.957 U17.2@90.612,147.857 90.612,147.582 90.897,147.297 90.897,147.116 91.096,146.917 ; v1(93.528,147.376) 93.468,147.376 93.009,146.917 91.313,146.917 ; C45.2@93.599,144.502 v1@93.599,147.42 ; R45.1@85.647,146.177 85.857,146.387 86.316,146.387 86.995,147.066 89.046,147.066 89.196,146.917 91.096,146.917 ; 91.096,146.917 91.313,146.917 ; 91.096,146.917 91.313,146.917
  Top Copper w0.5: v1@93.599,147.42 93.883,147.704 94.622,147.704 ; U7.2@99.362,134.724 99.385,134.747 U7.4@99.797,134.747 ; J4.3@99.492,137.414 99.438,137.414 99.168,137.685 99.168,140.093 99.438,140.364 J4.2@99.492,140.364 ; J4.3@99.635,137.391 99.758,137.391 100.006,137.143 100.006,135.98 100.324,135.662 100.324,134.995 100.006,134.677 ; U7.4@99.797,134.677 100.006,134.677 ; C36.1@99.997,132.969 C36.1@100.018,132.969 ; v1(100.838,132.842) 100.819,132.861 100.126,132.861 C36.1@100.018,132.969 ; C19.1@107.521,152.019 107.543,152.019 107.579,152.055 107.579,152.537 109.093,154.051 109.093,156.337 J_LED_CTRL1.18@110.236,157.48 ; C13.1@107.624,160.447 108.336,160.447 108.619,160.164 108.619,159.097 J_LED_CTRL1.18@110.236,157.48 ; J_LED_CTRL1.19@112.776,154.94 J_LED_CTRL1.18@110.236,157.48 ; R57.1@121.73,181.761 121.774,181.806 121.774,182.861 v1(121.793,182.88) ; J10.2@125.539,168.338 v1(126.682,168.338) 128.841,168.338 129.269,168.766 129.269,168.793 129.919,169.443 129.919,170.077 130.018,170.178 Q2.2@130.168,170.178 130.319,170.178 130.418,170.277 130.418,170.427 130.619,170.629 J8.1@130.619,172.022 ; 100.006,134.677 100.089,134.677 100.324,134.443 100.324,133.832 100.054,133.563 100.054,133.005 C36.1@100.018,132.969
  Top Copper w0.6: C12.1@98.425,166.719 v1(98.425,167.767) ; R64.1@120.459,181.761 R57.1@121.73,181.761
  Top Copper w1: C9.1@97.744,171.172 97.747,171.174 101.679,171.174 C11.1@101.681,171.177 ; C7.1@100.711,161.719 101.036,161.719 101.592,161.163 v1(102.235,161.163) v1(103.124,161.163) ; C13.1@107.623,160.449 107.624,160.45 C15.1@114.99,160.45
  L2_GND w0.5: v1(94.996,159.258) v1(94.996,160.147) 94.996,164.592 98.171,167.767 v1(98.425,167.767)
  other v1: 104.775,159.258 105.79,159.258 106.933,159.258 104.775,160.147 105.791,160.147 125.158,166.688 126.682,166.688 125.158,169.862 132.376,170.307 132.376,171.45 132.376,172.72 132.376,173.99 130.304,174.942
  other v2: 103.378,168.148 104.775,168.148 103.378,169.418 104.775,169.418 103.378,170.815 104.775,170.815 103.378,172.212 97.663,172.72 98.933,172.72 100.33,172.72 101.727,172.72 128.138,180.107 124.523,180.569 124.587,181.864 126.365,181.864 128.143,181.864
  other v3: 84.24,163.626 85.002,163.626
GND_TOP: C49.1 C50.1 C51.1 J_LED_TOP_SLIP2.01 J_LED_TOP_SLIP2.06 pad.4@117.983,102.997 U19.2 U19.4 U19.6 X3.C1 | length 19
  Top Copper w0.2: U19.2@97.614,93.133 97.614,92.405 97.818,92.2 97.818,90.96
  Top Copper w0.3: C51.1@96.266,90.932 C50.1@97.282,90.932 97.79,90.932 ; U19.6@96.459,96.146 96.459,94.824 97.354,93.929 97.354,93.402 97.414,93.343 97.414,93.905 98.354,94.846 98.354,96.141 U19.4@98.359,96.146 ; U19.2@97.409,93.338 U19.2@97.614,93.133 ; 97.818,90.96 97.79,90.932 ; C49.1@98.425,90.932 97.79,90.932
  Top Copper w0.6: U19.4@98.359,96.146 98.359,96.413 98.364,96.417 98.63,96.417 98.733,96.52 v1(99.314,96.52) v1(100.584,96.52) v1(101.854,96.52) 103.378,98.044 J_LED_TOP_SLIP2.06@103.378,98.171
  Top Copper w1: v2(123.698,96.901) 123.698,96.547 124.599,95.646 X3.C1@124.599,95.511
  other v1: 96.266,89.789 97.409,89.789
I2C_SCL_MTR: R60.2 U6.28 U20.31 | length 95
  Top Copper w0.2: v1(100.203,139.393) 100.28,139.47 100.788,139.47 102.161,140.843 102.749,140.843 104.542,139.05 105.273,139.05 U6.28@105.296,139.027 ; U20.31@123.052,176.328 123.073,176.349 123.456,176.349 123.705,176.598 v1(123.705,178.515) 124.452,178.515 R60.2@124.563,178.625
  L3_PWR_SIG w0.2: v1(100.203,139.393) 99.6,138.79 99.6,137.903 100.869,136.634 100.869,134.081 101.783,133.167 101.783,131.402 102.883,130.302 111.379,130.302 118.745,137.668 118.745,151.511 132.97,165.736 132.97,168.528 132.898,168.6 132.898,168.791 132.166,169.524 131.974,169.524 131.826,169.672 131.826,178.398 131.709,178.515 v1(123.705,178.515)
I2C_SDA_MTR: R59.2 U6.29 U20.30 | length 89.9
  Top Copper w0.2: v1(100.203,138.557) 100.28,138.634 100.534,138.634 102.362,140.462 102.635,140.462 104.397,138.7 104.572,138.7 104.622,138.65 105.273,138.65 U6.29@105.296,138.627 ; U20.30@123.052,175.828 123.073,175.849 123.451,175.849 124.086,176.484 124.086,176.801 124.385,177.101 124.486,177.101 125.184,177.8 v1(125.222,177.8)
  L3_PWR_SIG w0.2: v1(100.203,138.557) 100.15,138.504 100.15,137.848 101.219,136.779 101.219,134.226 102.193,133.252 102.193,131.487 102.997,130.683 111.265,130.683 118.395,137.813 118.395,151.656 132.62,165.881 132.62,168.37 132.548,168.442 132.548,168.646 132.021,169.174 131.816,169.174 131.445,169.545 131.445,177.683 131.328,177.8 v1(125.222,177.8)
INDEX_RAW: R38.2 R39.1 TP25.1 U6.25 U16.COLL U17.4 | length 26.6
  Top Copper w0.2: TP25.1@90.551,141.097 96.219,141.097 97.277,142.155 102.427,142.155 104.378,140.204 105.273,140.204 U6.25@105.296,140.227
  Top Copper w0.381: U16.COLL@85.427,140.34 85.449,140.318 85.449,137.436 R39.1@85.471,137.414 ; U17.4@89.662,144.907 89.682,144.887 89.682,143.022 R38.2@89.701,143.002 TP25.1@89.701,141.731
  Top Copper w0.8: U16.COLL@85.427,140.34 88.778,140.34 TP25.1@89.535,141.097
IR_GATE: Q1.1 R42.2 R45.2 TP24.1 | length 8.2
  Top Copper w0.381: TP24.1@81.026,150.876 81.026,147.547 82.33,146.243 Q1.1@82.48,146.243 82.513,146.21 83.914,146.21 R45.2@83.947,146.177 R42.2@83.947,147.574
LED_CTRL.LED_DIAG: J_LED_BLADE1.14 J_LED_CTRL1.14 TP20.1 U6.58 U11.42 | length 58
  Top Copper w0.2: U6.58@113.155,139.038 116.754,139.038 116.862,139.145 117.144,139.145 v1(117.221,139.222)
  Top Copper w0.3: U11.42@31.203,99.316 31.203,99.137 32.201,99.137 v1(32.258,99.08) ; v1(35.56,98.43) 45.395,98.43 45.721,98.104 45.721,98.053 46.075,97.699 46.7,97.699 TP20.1@47.244,97.155 ; J_LED_BLADE1.14@46.101,94.615 TP20.1@46.101,97.724
  Bottom Copper w0.2: J_LED_CTRL1.14@105.156,157.48 106.104,156.532 106.104,153.311 103.759,150.965 103.759,149.047 104.72,148.086 110.415,148.086 112.213,146.288 117.364,146.288 119.634,144.018 119.634,141.478 118.544,140.388 118.415,140.388 117.249,139.222 v1(117.221,139.222)
  Bottom Copper w0.3: v1(32.258,99.08) 32.258,99.06 32.888,98.43 v1(35.56,98.43)
LED_CTRL.LED_GCLK: J_LED_BLADE1.8 J_LED_CTRL1.8 TP18.1 U6.24 U10.29 U11.29 | length 74.8
  Top Copper w0.2: v1(98.933,143.51) 101.566,143.51 104.233,140.843 104.542,140.843 104.735,140.65 105.273,140.65 U6.24@105.296,140.627
  Top Copper w0.3: v3(23.44,98.48) 23.44,98.507 23.694,98.761 23.694,98.933 23.906,99.145 24.703,99.145 U11.29@24.703,99.316 ; v1(36.918,102.905) 36.918,102.977 38.335,104.394 38.967,104.394 39.642,105.069 39.642,105.493 40.719,106.571 51.006,106.571 51.115,106.68 51.137,106.68 v3(52.492,108.036)
  L3_PWR_SIG w0.2: J_LED_CTRL1.8@97.536,157.48 97.212,157.48 96.897,157.164 96.839,157.164 95.88,156.205 94.356,156.205 93.599,155.448 93.599,152.367 98.933,147.033 v1(98.933,143.51)
  L3_PWR_SIG w0.3: v3(23.44,98.48) 24.806,98.48 25.359,99.033 31.383,99.033 31.658,99.309 31.658,99.329 32.009,99.68 32.029,99.68 32.044,99.695 33.357,99.695 33.637,99.975 34.135,99.975 34.415,99.695 36.92,99.695 37.518,100.292 37.518,102.305 v1(36.918,102.905)
  Bottom Copper w0.3: v1(36.918,102.905) 37.968,101.855 37.968,95.403 38.481,94.89 J_LED_BLADE1.8@38.481,94.615 ; v3(52.492,108.036) 52.512,108.016 52.865,108.016 53.557,107.324 U10.29@53.557,107.097
LED_CTRL.LED_LAT: J_LED_BLADE1.7 J_LED_CTRL1.7 TP15.1 U6.50 U10.27 U11.27 | length 80.2
  Top Copper w0.2: U6.50@112.02,135.903 112.02,135.249 v1(112.649,134.62)
  Top Copper w0.3: v3(22.098,99.314) 22.098,100.215 22.409,100.526 U11.27@23.992,100.526 ; v1(36.918,100.541) 36.999,100.541 37.423,100.965 38.417,100.965 40.449,102.997 46.228,102.997 46.808,103.577 46.808,103.731 47.608,103.731 49.548,105.671 51.401,105.671 51.66,105.93 51.703,105.93 52.023,106.25 v3(52.05,106.25)
  L3_PWR_SIG w0.2: J_LED_CTRL1.7@97.536,154.94 97.536,150.765 99.569,148.732 99.569,141.477 102.362,138.684 102.362,134.874 103.019,134.217 108.874,134.217 109.277,134.62 v1(112.649,134.62)
  L3_PWR_SIG w0.3: v3(22.098,99.314) 25.003,99.314 25.799,100.11 31.787,100.11 32.218,100.541 v1(36.918,100.541)
  Bottom Copper w0.3: v1(36.918,100.541) 36.975,100.483 36.975,99.804 37.419,99.36 37.419,93.221 38.481,92.159 J_LED_BLADE1.7@38.481,92.075 ; v3(52.05,106.25) 52.05,106.232 52.395,105.887 U10.27@52.846,105.887
LED_CTRL.LED_SCLK: J_LED_BLADE1.6 J_LED_CTRL1.6 TP13.1 U6.20 U10.28 U11.28 | length 65
  Top Copper w0.2: v1(103.947,146.03) 103.471,145.554 103.471,143.415 104.636,142.25 105.273,142.25 U6.20@105.296,142.227
  Top Copper w0.3: v3(22.733,99.949) 22.76,99.949 22.837,100.026 U11.28@23.992,100.026 ; v1(36.918,101.854) 38.669,101.854 40.26,103.445 40.26,103.525 41.129,104.394 TP13.1@41.529,104.394 41.369,104.554 41.155,104.554 40.64,105.069 40.64,105.68 41.081,106.121 51.214,106.121 51.843,106.75 51.887,106.75 52.247,107.11 v3(52.275,107.11)
  L3_PWR_SIG w0.3: v3(22.733,99.949) 23.344,100.56 31.6,100.56 32.219,101.178 36.027,101.178 36.174,101.325 36.386,101.325 36.915,101.854 v1(36.918,101.854)
  Bottom Copper w0.2: J_LED_CTRL1.6@94.996,157.48 94.996,156.281 96.588,154.69 96.588,153.389 v1(103.947,146.03)
  Bottom Copper w0.3: J_LED_BLADE1.6@35.941,94.615 35.941,94.946 36.318,95.323 36.318,101.265 36.907,101.854 v1(36.918,101.854) ; v3(52.275,107.11) 52.294,107.091 52.294,106.713 52.619,106.388 U10.28@52.846,106.388
LED_CTRL.LED_SIN: J_LED_BLADE1.5 J_LED_CTRL1.5 TP11.1 U6.65 U10.26 | length 61.9
  Top Copper w0.2: U6.65@113.144,141.827 113.167,141.804 113.705,141.804 114.196,141.313 114.196,140.772 v1(114.256,140.713)
  Top Copper w0.3: TP11.1@35.433,97.155 35.833,97.155 36.508,96.48 36.508,95.575 37.003,95.08 37.003,93.137 J_LED_BLADE1.5@35.941,92.075 ; v1(39.116,100.457) 39.116,100.965 40.64,102.489 46.609,102.489 47.401,103.281 49.233,103.281 49.408,103.457 49.408,104.272 50.222,105.086 51.496,105.086 51.84,105.43 v3(51.867,105.43)
  L3_PWR_SIG w0.3: J_LED_BLADE1.5@35.941,92.075 37.419,93.553 37.419,96.836 38.1,97.517 38.1,99.441 v1(39.116,100.457)
  Bottom Copper w0.2: J_LED_CTRL1.5@94.996,154.94 95.225,154.711 95.225,153.568 103.4,145.393 104.543,145.393 106.225,143.711 113.538,143.711 114.427,142.822 114.427,141.853 114.254,141.68 114.254,140.714 v1(114.256,140.713)
  Bottom Copper w0.3: v3(51.867,105.43) 51.894,105.43 51.936,105.387 U10.26@52.846,105.387
LED_CTRL.ROW_A0: J_LED_BLADE1.9 J_LED_CTRL1.9 R33.2 TP12.1 U6.9 | length 46.5
  Top Copper w0.2: J_LED_CTRL1.9@100.076,154.94 103.251,151.765 105.283,151.765 105.537,151.511 105.54,151.511 107.51,149.541 107.51,148.864 107.51,148.423 107.656,148.277 108.097,148.277 108.898,147.476 108.898,146 109.07,145.828 109.22,145.678 U6.9@109.22,143.751
  Top Copper w0.3: TP12.1@38.481,97.155 38.881,97.155 39.556,96.48 39.556,93.54 J_LED_BLADE1.9@41.021,92.075
  Bottom Copper w0.4: R33.2@37.465,114.085 37.465,113.115 38.639,111.941 38.639,109.57 40.239,107.97 40.239,96.766 39.909,96.436 39.909,93.187 J_LED_BLADE1.9@41.021,92.075
LED_CTRL.ROW_A1: J_LED_BLADE1.10 J_LED_CTRL1.10 R34.2 TP16.1 U6.10 | length 22.4
  Top Copper w0.2: v1(103.124,150.114) 104.541,150.114 104.837,150.41 106.146,150.41 107.036,149.52 107.036,148.401 107.511,147.927 107.952,147.927 108.548,147.331 108.548,145.855 108.82,145.583 U6.10@108.82,143.751
  Top Copper w0.3: J_LED_BLADE1.10@41.021,94.615 41.021,96.901 TP16.1@41.275,97.155
  Bottom Copper w0.2: J_LED_CTRL1.10@100.076,157.48 100.076,156.281 101.668,154.69 101.668,151.57 v1(103.124,150.114)
LED_CTRL.ROW_A2: J_LED_BLADE1.11 J_LED_CTRL1.11 R35.2 TP19.1 U6.11 | length 44.3
  Top Copper w0.2: v1(105.918,149.86) 105.918,149.025 107.366,147.577 107.807,147.577 108.198,147.186 108.198,145.71 108.42,145.488 U6.11@108.42,143.751
  Top Copper w0.4: v1(43.088,105.521) 43.126,105.483 43.342,105.483 44.431,104.394 TP19.1@44.831,104.394
  L3_PWR_SIG w0.2: J_LED_CTRL1.11@102.616,154.94 102.805,155.129 103.44,155.129 104.267,155.956 105.918,155.956 106.299,155.575 106.299,153.002 105.283,151.986 105.283,150.495 v1(105.918,149.86)
  Bottom Copper w0.4: R35.2@40.132,114.124 40.132,114.074 40.332,113.874 40.418,113.874 40.652,113.64 40.652,113.617 40.762,113.507 40.762,109.638 43.053,107.347 43.053,105.556 v1(43.088,105.521) ; v1@43.053,105.521 43.053,95.68 42.449,95.076 42.449,94.154 43.053,93.55 43.053,92.871 43.561,92.363 J_LED_BLADE1.11@43.561,92.075
LED_CTRL.ROW_A3: J_LED_BLADE1.12 J_LED_CTRL1.12 R36.2 TP21.1 U6.12 | length 45.3
  Top Copper w0.2: v1(104.521,149.352) 104.598,149.275 104.852,149.275 106.041,148.086 106.362,148.086 107.221,147.227 107.435,147.227 107.848,146.814 107.848,145.565 108.02,145.393 U6.12@108.02,143.751
  Top Copper w0.3: J_LED_BLADE1.12@43.561,94.615 43.561,94.946 44.196,95.581 TP21.1@44.196,97.155
  Bottom Copper w0.2: J_LED_CTRL1.12@102.616,157.48 102.768,157.632 103.614,157.632 104.411,158.428 105.549,158.428 106.748,157.23 106.748,154.547 107.103,154.192 107.103,151.934 v1(104.521,149.352)
  Bottom Copper w0.4: R36.2@41.312,114.346 41.312,109.945 43.815,107.442 43.815,95.411 43.776,95.372 43.776,94.83 J_LED_BLADE1.12@43.561,94.615
LED_CTRL.ROW_BLANK: J_LED_BLADE1.13 J_LED_CTRL1.13 R32.1 R37.2 TP22.1 U6.26 | length 53.4
  Top Copper w0.2: v1(101.224,141.478) 102.609,141.478 104.26,139.827 U6.26@105.296,139.827
  Top Copper w0.3: J_LED_BLADE1.13@46.101,92.075 47.371,93.345 47.371,95.631 47.77,96.03 48.894,96.03 50.019,97.155 TP22.1@50.419,97.155
  L3_PWR_SIG w0.2: v1(101.224,141.478) 101.224,141.586 101.092,141.718 101.092,150.876 J_LED_CTRL1.13@105.156,154.94
  Bottom Copper w0.4: R37.2@42.672,114.339 42.472,114.139 42.472,113.719 41.922,113.169 41.922,110.351 44.703,107.57 44.703,93.473 J_LED_BLADE1.13@46.101,92.075
  Bottom Copper w0.6: R37.2@42.672,114.339 R32.1@44.069,114.339
MOTOR_CMD: R55.1 U6.21 | length 60.8
  Top Copper w0.2: v1(102.324,144.067) 104.564,141.827 U6.21@105.296,141.827
  Top Copper w0.3: R55.1@127.825,178.421 127.825,178.471 128.362,179.007 128.721,179.007 v1(128.778,179.065)
  L3_PWR_SIG w0.3: v1(102.324,144.067) 102.324,145.337 105.173,148.186 106.022,148.186 111.428,153.592 113.656,153.592 115.897,155.832 115.897,178.254 117.663,180.02 119.433,180.02 120.338,179.115 128.728,179.115 v1(128.778,179.065)
MOTOR_FAULT: R61.1 U6.59 U20.40 | length 43.6
  Top Copper w0.2: U6.59@113.144,139.427 116.648,139.427 117.193,139.972 v1(117.221,139.972)
  L3_PWR_SIG w0.2: v1(117.221,139.972) 116.586,140.607 116.586,155.018 116.647,155.078 116.647,169.489 117.856,170.699 v1(117.856,178.435)
MOTOR_FG: R62.1 U6.16 U20.29 | length 59.4
  Top Copper w0.2: v1(104.147,143.517) 104.223,143.593 104.707,143.593 105.425,144.312 105.643,144.312 105.789,144.458 106.251,144.458 106.397,144.312 106.397,143.774 U6.16@106.42,143.751 ; U20.29@123.052,175.328 124.147,175.328 R62.1@124.396,175.577 124.446,175.577 125.449,174.575 125.78,174.575 v1(125.857,174.498)
  L3_PWR_SIG w0.2: v1(104.147,143.517) 107.497,146.867 108.021,146.867 111.294,150.14 111.294,151.188 113.298,153.192 113.822,153.192 116.297,155.667 116.297,177.653 118.263,179.62 119.267,179.62 121.11,177.778 123.338,177.778 125.857,175.258 v1(125.857,174.498)
MOTOR_INT.MOTOR_PWR_EN: R63.1 U6.39 | length 64
  Top Copper w0.2: v1(106.934,134.874) 107.011,134.951 107.206,134.951 107.597,135.342 107.597,135.88 U6.39@107.62,135.903 ; v1(118.364,182.88) 118.889,182.355 118.889,182.061 R63.1@119.189,181.761
  L3_PWR_SIG w0.2: v1(106.934,134.874) 104.759,134.874 102.712,136.921 102.712,138.829 101.774,139.767 101.774,145.352 105.732,149.31 106.146,149.31 110.827,153.992 113.49,153.992 115.497,155.998 115.497,181.679 116.697,182.88 v1(118.364,182.88)
MOTOR_U: J6.1 U20.13 U20.14
MOTOR_V: J6.2 U20.16 U20.17
MOTOR_W: J6.3 U20.19 U20.20
NetANT1_1: ANT1.1 C38_DNP.1 L7.2 | length 2.4
  Top Copper w0.25: L7.2@97.857,129.921 98.809,129.921 99.008,129.723 99.008,129.701 99.169,129.54 C38_DNP.1@99.19,129.54
  Top Copper w0.35: C38_DNP.1@99.19,129.54 99.238,129.492 99.238,128.651
NetB1_19: B1.19 R37.1 | length 2.1
  Bottom Copper w0.3: B1.19@41.718,117.678 41.793,117.603 41.793,116.866 42.055,116.604 42.246,116.604 42.422,116.429 42.422,116.289 R37.1@42.672,116.039
NetB1_20: B1.20 R36.1 | length 1.7
  Bottom Copper w0.3: B1.20@41.068,117.678 41.143,117.603 41.143,116.214 R36.1@41.312,116.046
NetB1_21: B1.21 R35.1 | length 2
  Bottom Copper w0.3: R35.1@40.132,115.824 40.382,116.074 40.382,116.264 40.418,116.3 B1.21@40.418,117.678
NetB1_22: B1.22 R34.1 | length 2.3
  Bottom Copper w0.3: R34.1@38.862,115.785 38.862,115.835 39.693,116.666 39.693,117.603 B1.22@39.768,117.678
NetB1_23: B1.23 R33.1 | length 2.9
  Bottom Copper w0.4: R33.1@37.465,115.785 37.465,115.835 38.215,116.585 38.832,116.585 39.043,116.796 39.043,117.091 39.118,117.166 B1.23@39.118,117.678
NetC6_1: C6.1 U4.13
NetC6_2: C6.2 L2.2 U4.7
NetC7_2: C7.2 C8.2 R9.2 U3.5 U3.6 U3.7 U3.8 U4.8
NetC8_1: C8.1 R9.1 U3.4 U4.9 | length 8.5
  Top Copper w0.3: U4.9@98.815,165.037 99.06,165.282 99.06,165.989 99.722,166.651 R9.1@100.103,166.651
  Top Copper w0.5: R9.1@100.171,166.719 C8.1@101.219,166.719 103.156,166.719 105.129,164.746 105.129,164.424 U3.4@105.194,164.424
NetC12_2: C12.2 U4.10 | length 1.1
  Top Copper w0.3: U4.10@98.29,164.837 98.29,165.727 C12.2@98.425,165.862